# Altium PCB PCB1.PcbDoc (part 2 of 2)
Units mm, origin at the board's own origin, x right, y up, seen from the top; angles counter-clockwise.
Board outline 100.2 x 69.85 mm, 2 copper layers (Top Layer, Bottom Layer); 190 components, 160 nets, 546 pads, 233 vias.
Unrouted connection lines stored in the file: 15.
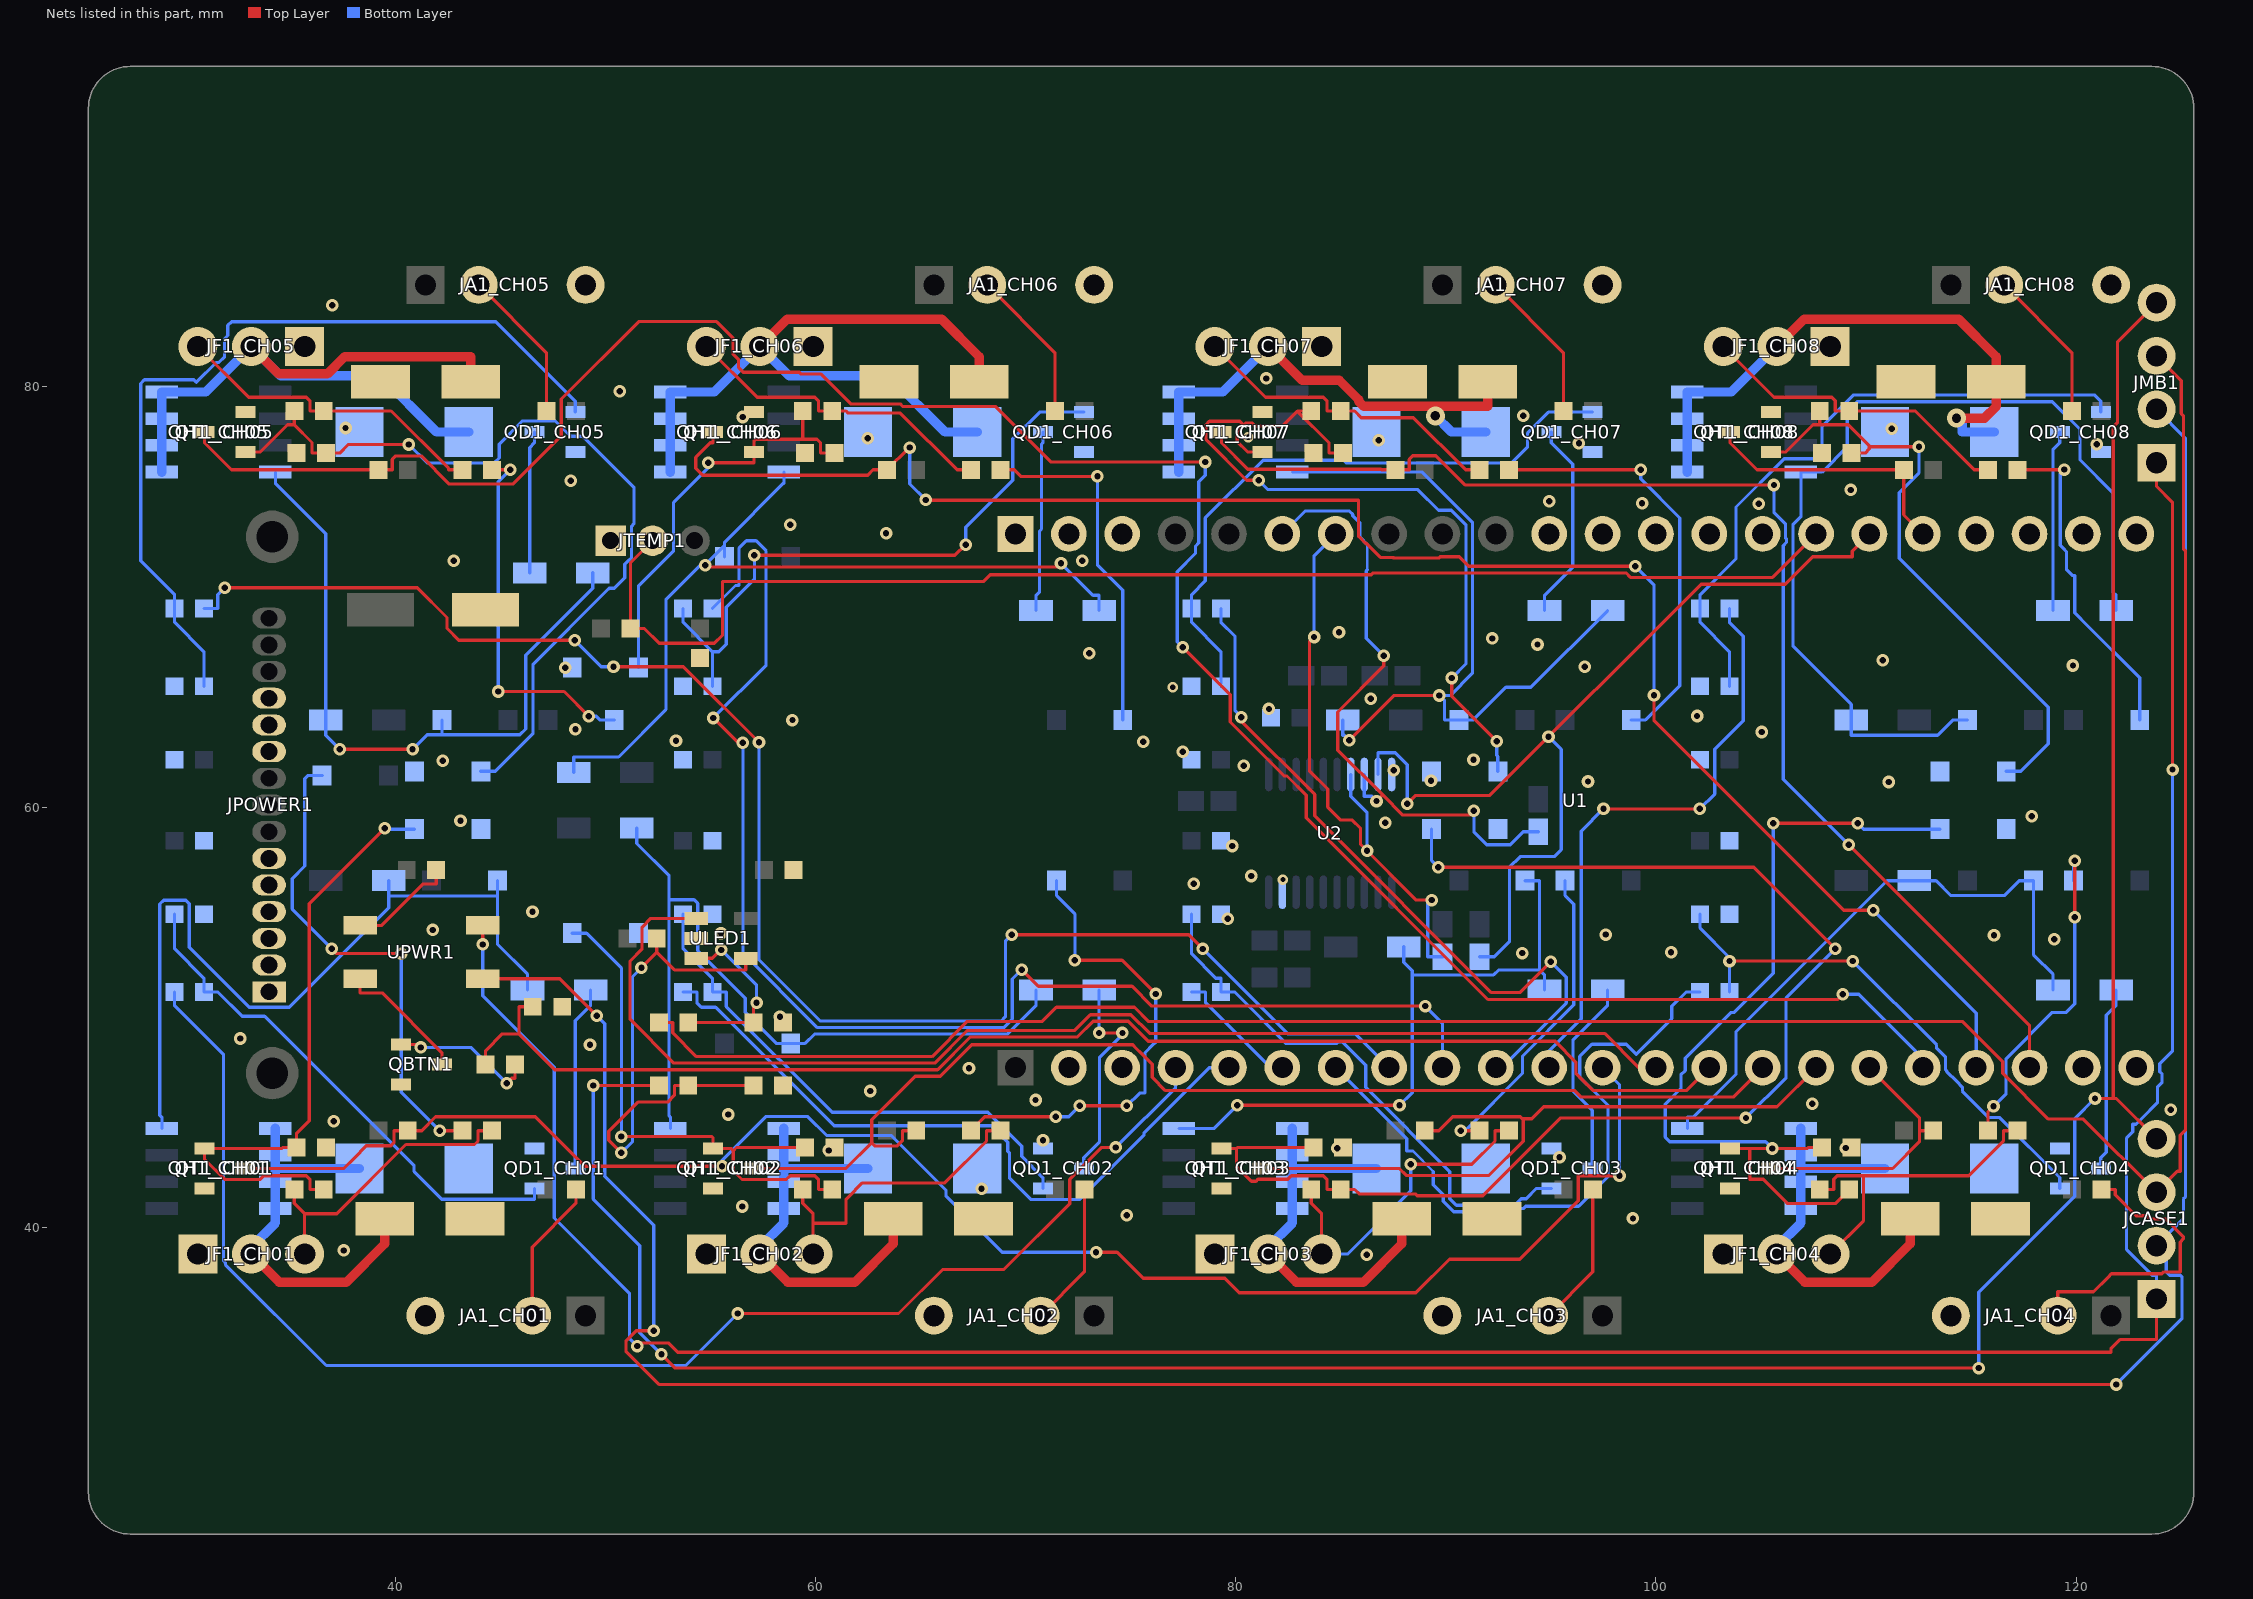
[diagram p2: the nets of this part, all layers, seen from the top]

## Via types
v1: diameter 0.6, hole 0.3, Top Layer to Bottom Layer, 228 vias
v2: diameter 0.5, hole 0.25, Top Layer to Bottom Layer, 3 vias
v3: diameter 0.9, hole 0.45, Top Layer to Bottom Layer, 2 vias

## Nets (pads, with @x,y where several pads share a name; then routed paths per layer and width w, separated by ;. In a path a pad name is that pad's centre, name@x,y a point inside that pad or via, vN(x,y) a via of type N, cw(c..) or ccw(c..) an arc to the next point about the centre after c; other vN are vias at no path point) (continued)
ARGB_DATA_CH06: SJ1_CH06.1 U1.J3_7 U2.7 | length 28.5
  Top Layer w0.155: v1(83.731,68.093) 83.51,67.872 83.51,61.733 84.382,60.861 84.382,59.999 84.998,59.383 85.549,59.383 85.941,58.992 85.941,58.231 88.598,55.574 v1(89.325,55.574)
  Bottom Layer w0.155: v1(83.731,68.093) 83.731,71.97 U1.J3_7@84.761,73 ; U2.7@85.475,61.55 85.475,60.516 86.254,59.737 v1(86.254,57.918) ; v1(89.325,55.574) 89.141,55.39 89.141,52.875 SJ1_CH06.1@89.85,52.875
ARGB_DATA_CH07: SJ1_CH07.1 U1.J3_6 U2.8 | length 31.2
  Top Layer w0.155: v1(86.701,60.287) 86.99,60.576 ; v1(87.052,67.198) 87.052,66.716 84.861,64.525 84.861,62.705 86.99,60.576 ; v1(91.337,59.822) 91.135,59.62 87.946,59.62 86.99,60.576
  Bottom Layer w0.116: 86.27,71.292 86.27,72.487
  Bottom Layer w0.155: U1.J3_6@82.221,73 83.313,74.092 85.408,74.092 85.572,73.928 85.572,73.869 85.883,73.559 85.923,73.519 85.923,73.091 85.923,72.835 86.27,72.487 ; U2.8@86.125,61.55 86.125,60.516 86.472,60.516 v1(86.701,60.287) ; 86.27,71.292 86.218,71.24 86.218,68.031 v1(87.052,67.198) ; v1(91.337,59.822) 91.337,58.825 91.953,58.209 93.075,58.209 93.691,58.825 SJ1_CH07.1@94.4,58.825
ARGB_DATA_CH08: SJ1_CH08.1 U1.J3_17 U2.9 | length 45.7
  Top Layer w0.155: v1(88.167,60.154) 88.569,60.556 92.097,60.556 102.151,70.61 106.159,70.61 107.466,71.917 109.339,71.917 109.339,72.178 U1.J3_17@110.161,73
  Bottom Layer w0.155: U2.9@86.775,61.55 86.775,62.584 87.601,62.584 88.167,62.018 v1(88.167,60.154) ; SJ1_CH08.1@91.6,52.875 92.309,52.875 93.028,53.594 93.028,56.21 93.028,56.43 93.028,56.915 93.028,57.134 93.539,57.645 95.164,57.645 95.495,57.976 95.495,62.745 v1(94.89,63.349)
DB_CH01: QD1_CH01.1 RBE1_CH01.1 RPWM1_CH01.2 | length 24.8
  Bottom Layer w0.155: RBE1_CH01.1@29.5,54.9 29.5,53.259 30.9,51.859 RPWM1_CH01.2@30.9,51.2 31.559,51.2 32.714,50.046 33.782,50.046 40.897,42.931 40.897,42.654 42.215,41.336 46.625,41.336 QD1_CH01.1@46.625,41.85
DB_CH02: QD1_CH02.1 RBE1_CH02.1 RPWM1_CH02.2 | length 24.9
  Bottom Layer w0.155: RBE1_CH02.1@53.7,54.9 53.7,53.259 55.1,51.859 RPWM1_CH02.2@55.1,51.2 55.759,51.2 55.759,50.507 60.791,45.475 68.197,45.475 69.813,43.859 69.813,43.376 70.825,42.364 QD1_CH02.1@70.825,41.85
DB_CH03: QD1_CH03.1 RBE1_CH03.1 RPWM1_CH03.2 | length 26.1
  Bottom Layer w0.155: RBE1_CH03.1@77.9,54.9 77.9,53.016 79.057,51.859 79.3,51.859 RPWM1_CH03.2@79.3,51.2 79.959,51.2 82.412,48.747 84.35,48.747 84.79,48.747 84.858,48.815 85.093,48.815 86.187,47.722 86.187,46.662 90.193,42.655 90.193,41.366 90.505,41.054 93.276,41.054 93.584,41.362 93.827,41.362 94.316,41.85 QD1_CH03.1@95.025,41.85
DB_CH04: QD1_CH04.1 RBE1_CH04.1 RPWM1_CH04.2 | length 25.4
  Top Layer w0.155: v1(103.5,52.671) v1(109.369,52.671)
  Bottom Layer w0.155: RBE1_CH04.1@102.1,54.9 102.1,54.241 103.5,52.841 RPWM1_CH04.2@103.5,51.2 ; v1(109.369,52.671) 113.357,48.683 113.357,48.528 113.629,48.256 113.784,48.101 113.784,47.5 113.848,47.435 113.848,47.41 114.314,46.944 114.585,46.672 114.585,46.484 115.847,45.223 116.373,45.223 119.225,42.371 QD1_CH04.1@119.225,41.85
DB_CH05: QD1_CH05.1 RBE1_CH05.1 RPWM1_CH05.2 | length 40.5
  Bottom Layer w0.155: RBE1_CH05.1@30.9,65.75 30.9,67.391 29.5,68.791 29.5,70.109 27.889,71.72 27.889,80.159 28.065,80.335 30.418,80.335 30.54,80.213 31.485,81.158 31.612,81.158 31.88,81.425 31.88,82.287 32.035,82.442 32.035,82.923 32.214,83.101 44.788,83.101 48.575,79.314 QD1_CH05.1@48.575,78.8
DB_CH06: QD1_CH06.1 RBE1_CH06.1 RPWM1_CH06.2 | length 30
  Top Layer w0.155: v1(57.096,71.981) 66.64,71.981 v1(67.151,72.492)
  Bottom Layer w0.155: RPWM1_CH06.2@53.7,69.45 53.7,68.791 55.1,67.391 ; RBE1_CH06.1@55.1,65.75 55.1,67.391 ; v1(57.096,71.981) 57.096,70.844 55.992,69.739 55.989,69.739 55.758,69.508 55.758,67.755 55.393,67.391 55.1,67.391 ; v1(67.151,72.492) 67.151,73.312 69.393,75.554 69.393,77.526 70.667,78.8 QD1_CH06.1@72.775,78.8
DB_CH07: QD1_CH07.1 RBE1_CH07.1 RPWM1_CH07.2 | length 29.9
  Bottom Layer w0.155: RBE1_CH07.1@79.3,65.75 79.3,67.391 77.9,68.791 77.9,70.109 78.556,70.765 78.556,73.761 81.303,76.509 85.131,76.509 85.262,76.378 93.131,76.378 93.891,77.139 93.891,77.808 94.884,78.8 QD1_CH07.1@96.975,78.8
DB_CH08: QD1_CH08.1 RBE1_CH08.1 RPWM1_CH08.2 | length 30.8
  Bottom Layer w0.155: RBE1_CH08.1@103.5,65.75 103.5,67.391 102.1,68.791 102.1,70.109 103.811,71.82 103.811,74.28 106.104,76.573 107.664,76.573 107.909,76.818 107.909,78.128 109.389,79.607 120.882,79.607 121.175,79.314 QD1_CH08.1@121.175,78.8
DC_CH01: QD1_CH01.3 RG1_CH01.2 | length 8.8
  Bottom Layer w0.155: QD1_CH01.3@48.575,42.8 48.575,49.841 49.3,50.566 RG1_CH01.2@49.3,51.3
DC_CH02: QD1_CH02.3 RG1_CH02.2 | length 10.4
  Top Layer w0.155: v1(73.5,49.252) v1(74.61,49.252)
  Bottom Layer w0.155: QD1_CH02.3@72.775,42.8 72.775,43.314 73.517,44.056 73.517,48.073 74.61,49.166 v1(74.61,49.252) ; v1(73.5,49.252) RG1_CH02.2@73.5,51.3
DC_CH03: QD1_CH03.3 RG1_CH03.2 | length 9.6
  Bottom Layer w0.155: QD1_CH03.3@96.975,42.8 96.975,45.562 96.06,46.477 96.06,48.925 97.7,50.566 RG1_CH03.2@97.7,51.3
DC_CH04: QD1_CH04.3 RG1_CH04.2 | length 8.8
  Bottom Layer w0.155: QD1_CH04.3@121.175,42.8 121.175,43.314 121.433,43.572 121.433,50.099 121.9,50.566 RG1_CH04.2@121.9,51.3
DC_CH05: QD1_CH05.3 RG1_CH05.2 | length 6.8
  Bottom Layer w0.155: RG1_CH05.2@46.4,71.15 46.4,77.111 46.625,77.336 QD1_CH05.3@46.625,77.85
DC_CH06: QD1_CH06.3 RG1_CH06.2 | length 8.6
  Bottom Layer w0.155: RG1_CH06.2@70.5,69.35 70.5,70.084 70.668,70.252 70.668,72.919 70.668,73.138 70.759,73.229 70.759,77.27 70.825,77.336 QD1_CH06.3@70.825,77.85
DC_CH07: QD1_CH07.3 RG1_CH07.2 | length 9.5
  Bottom Layer w0.155: RG1_CH07.2@94.7,69.35 94.7,70.084 96.036,71.42 96.036,76.325 95.025,77.336 QD1_CH07.3@95.025,77.85
DC_CH08: QD1_CH08.3 RG1_CH08.2 | length 8.6
  Bottom Layer w0.155: RG1_CH08.2@118.9,69.35 118.9,70.084 118.897,70.088 118.897,77.007 119.225,77.336 QD1_CH08.3@119.225,77.85
FAN_VOUT_CH01: COUT1_CH01.1 DF1_CH01.1 JF1_CH01.2 QH1_CH01.5 QH1_CH01.6 QH1_CH01.7 QH1_CH01.8 | length 19.3
  Top Layer w0.45: JF1_CH01.2@33.15,38.73 34.49,37.39 37.676,37.39 39.505,39.218 COUT1_CH01.1@39.505,40.4
  Bottom Layer w0.45: JF1_CH01.2@33.15,38.73 33.15,39.063 34.3,40.213 34.3,42.8 ; QH1_CH01.5@34.3,44.705 34.3,42.8 ; DF1_CH01.1@38.3,42.8 34.3,42.8
FAN_VOUT_CH02: COUT1_CH02.1 DF1_CH02.1 JF1_CH02.2 QH1_CH02.5 QH1_CH02.6 QH1_CH02.7 QH1_CH02.8 | length 19.3
  Top Layer w0.45: JF1_CH02.2@57.35,38.73 58.69,37.39 61.876,37.39 63.705,39.218 COUT1_CH02.1@63.705,40.4
  Bottom Layer w0.45: JF1_CH02.2@57.35,38.73 57.35,39.063 58.5,40.213 58.5,42.8 ; QH1_CH02.5@58.5,44.705 58.5,42.8 ; DF1_CH02.1@62.5,42.8 58.5,42.8
FAN_VOUT_CH03: COUT1_CH03.1 DF1_CH03.1 JF1_CH03.2 QH1_CH03.5 QH1_CH03.6 QH1_CH03.7 QH1_CH03.8 | length 19.3
  Top Layer w0.45: JF1_CH03.2@81.55,38.73 82.89,37.39 86.076,37.39 87.905,39.218 COUT1_CH03.1@87.905,40.4
  Bottom Layer w0.45: JF1_CH03.2@81.55,38.73 81.55,39.063 82.7,40.213 82.7,42.8 ; QH1_CH03.5@82.7,44.705 82.7,42.8 ; DF1_CH03.1@86.7,42.8 82.7,42.8
FAN_VOUT_CH04: COUT1_CH04.1 DF1_CH04.1 JF1_CH04.2 QH1_CH04.5 QH1_CH04.6 QH1_CH04.7 QH1_CH04.8 | length 19.3
  Top Layer w0.45: JF1_CH04.2@105.75,38.73 107.09,37.39 110.276,37.39 112.105,39.218 COUT1_CH04.1@112.105,40.4
  Bottom Layer w0.45: JF1_CH04.2@105.75,38.73 105.75,39.063 106.9,40.213 106.9,42.8 ; QH1_CH04.5@106.9,44.705 106.9,42.8 ; DF1_CH04.1@110.9,42.8 106.9,42.8
FAN_VOUT_CH05: COUT1_CH05.1 DF1_CH05.1 JF1_CH05.2 QH1_CH05.5 QH1_CH05.6 QH1_CH05.7 QH1_CH05.8 | length 33.5
  Top Layer w0.45: JF1_CH05.2@33.15,81.92 34.457,80.613 36.773,80.613 37.591,81.432 43.595,81.432 COUT1_CH05.1@43.595,80.25
  Bottom Layer w0.45: QH1_CH05.5@28.9,75.945 QH1_CH05.8@28.9,79.755 30.057,79.755 30.058,79.754 30.983,79.754 JF1_CH05.2@33.15,81.92 34.545,80.525 39.293,80.525 41.968,77.85 DF1_CH05.1@43.5,77.85
FAN_VOUT_CH06: COUT1_CH06.1 DF1_CH06.1 JF1_CH06.2 QH1_CH06.5 QH1_CH06.6 QH1_CH06.7 QH1_CH06.8 | length 33.9
  Top Layer w0.45: JF1_CH06.2@57.35,81.92 58.657,83.227 66,83.227 67.795,81.432 COUT1_CH06.1@67.795,80.25
  Bottom Layer w0.45: QH1_CH06.5@53.1,75.945 QH1_CH06.8@53.1,79.755 55.185,79.755 JF1_CH06.2@57.35,81.92 58.745,80.525 63.493,80.525 66.168,77.85 DF1_CH06.1@67.7,77.85
FAN_VOUT_CH07: COUT1_CH07.1 DF1_CH07.1 JF1_CH07.2 QH1_CH07.5 QH1_CH07.6 QH1_CH07.7 QH1_CH07.8 | length 25
  Top Layer w0.45: JF1_CH07.2@81.55,81.92 83.158,80.312 84.928,80.312 85.857,79.382 85.857,79.304 86.093,79.068 v3@89.501,79.068 ; v3(89.501,78.621) v3@89.501,79.068 ; COUT1_CH07.1@91.995,80.25 91.995,79.068 v3@89.501,79.068
  Bottom Layer w0.45: QH1_CH07.5@77.3,75.945 QH1_CH07.8@77.3,79.755 79.385,79.755 JF1_CH07.2@81.55,81.92 ; v3(89.501,78.621) 90.272,77.85 DF1_CH07.1@91.9,77.85
FAN_VOUT_CH08: COUT1_CH08.1 DF1_CH08.1 JF1_CH08.2 QH1_CH08.5 QH1_CH08.6 QH1_CH08.7 QH1_CH08.8 | length 27.5
  Top Layer w0.45: JF1_CH08.2@105.75,81.92 107.057,83.227 114.4,83.227 116.195,81.432 116.195,79.068 115.638,78.511 v3(114.305,78.511)
  Bottom Layer w0.45: QH1_CH08.5@101.5,75.945 QH1_CH08.8@101.5,79.755 103.585,79.755 JF1_CH08.2@105.75,81.92 ; v3(114.305,78.511) 114.568,78.248 114.568,77.85 DF1_CH08.1@116.1,77.85
GATE_CH01: DZ1_CH01.2 QH1_CH01.4 RG1_CH01.1 RGS1_CH01.2 | length 39.2
  Bottom Layer w0.155: QH1_CH01.4@28.9,44.705 28.9,45.239 28.799,45.34 28.799,55.386 28.984,55.571 30.032,55.571 30.2,55.403 30.2,53.326 33.054,50.473 34.959,50.473 39.7,55.214 39.7,55.766 ; RGS1_CH01.2@39.7,56.5 39.7,55.766 ; DZ1_CH01.2@44.875,56.5 44.875,55.766 ; RG1_CH01.1@46.3,51.3 46.3,52.034 44.875,53.459 44.875,55.766 ; 39.7,55.766 44.875,55.766
GATE_CH02: DZ1_CH02.2 QH1_CH02.4 RG1_CH02.1 RGS1_CH02.2 | length 38.5
  Bottom Layer w0.155: RGS1_CH02.2@51.5,59 51.5,58.266 53.033,56.733 53.033,55.591 ; QH1_CH02.4@53.1,44.705 53.1,45.239 53.033,45.306 53.033,55.591 ; RG1_CH02.1@70.5,51.3 70.5,50.566 69.131,49.196 59.956,49.196 59.509,48.75 58.141,48.75 56.665,50.226 56.665,50.908 54.4,53.173 54.4,55.413 54.223,55.591 53.033,55.591
GATE_CH03: DZ1_CH03.2 QH1_CH03.4 RG1_CH03.1 RGS1_CH03.2 | length 31.1
  Top Layer w0.155: v1(80.079,45.806) v1(87.798,45.806)
  Bottom Layer w0.155: QH1_CH03.4@77.3,44.705 78.978,44.705 v1(80.079,45.806) ; v1(87.798,45.806) 88.399,46.406 88.399,52.01 ; RGS1_CH03.2@88,53.35 88,52.616 88.399,52.217 88.399,52.01 ; DZ1_CH03.2@93.775,56.5 94.459,56.5 94.459,52.246 ; RG1_CH03.1@94.7,51.3 94.7,52.034 94.671,52.034 94.459,52.246 ; 88.399,52.01 92.274,52.01 92.511,52.246 94.459,52.246
GATE_CH04: DZ1_CH04.2 QH1_CH04.4 RG1_CH04.1 RGS1_CH04.2 | length 29
  Bottom Layer w0.155: QH1_CH04.4@101.5,44.705 101.5,45.239 101.767,45.239 103.811,47.283 103.811,49.314 110.997,56.5 113.334,56.5 114.043,55.791 116.582,55.791 117.291,56.5 DZ1_CH04.2@117.975,56.5 117.975,52.959 118.9,52.034 RG1_CH04.1@118.9,51.3
GATE_CH05: DZ1_CH05.2 QH1_CH05.4 RG1_CH05.1 RGS1_CH05.2 | length 33.2
  Top Layer w0.155: v1(37.367,62.749) v1(40.828,62.749)
  Bottom Layer w0.155: QH1_CH05.4@34.3,75.945 34.3,75.411 36.7,73.011 36.7,63.416 v1(37.367,62.749) ; v1(40.828,62.749) 41.52,63.441 42.225,63.441 ; DZ1_CH05.2@42.225,64.15 42.225,63.441 ; RG1_CH05.1@49.4,71.15 49.4,70.416 46.21,67.226 46.21,63.716 45.935,63.441 42.225,63.441
GATE_CH06: DZ1_CH06.2 QH1_CH06.4 RG1_CH06.1 RGS1_CH06.2 | length 40.6
  Top Layer w0.155: v1(54.759,71.504) 54.837,71.425 71.505,71.425 v1(71.686,71.606)
  Bottom Layer w0.155: RGS1_CH06.2@48.5,61.65 48.5,62.384 50.632,62.384 52.887,64.639 52.887,69.871 54.52,71.504 v1(54.759,71.504) 54.759,71.534 55.675,72.451 ; DZ1_CH06.2@55.675,71.9 55.675,72.451 ; QH1_CH06.4@58.5,75.945 58.5,75.411 58.477,75.411 55.675,72.609 55.675,72.451 ; v1(71.686,71.606) 73.207,70.084 73.5,70.084 RG1_CH06.1@73.5,69.35
GATE_CH07: DZ1_CH07.2 QH1_CH07.4 RG1_CH07.1 RGS1_CH07.2 | length 36.2
  Top Layer w0.155: v1(85.398,63.184) 87.523,65.309 v1(89.688,65.309)
  Bottom Layer w0.155: QH1_CH07.4@82.7,75.945 88.886,75.945 91.268,73.563 91.268,66.366 90.21,65.309 v1(89.688,65.309) 89.941,65.056 89.941,64.15 91.309,64.15 92.861,65.701 94.051,65.701 RG1_CH07.1@97.7,69.35 ; RGS1_CH07.2@85.1,64.15 85.1,63.416 85.167,63.416 v1(85.398,63.184)
GATE_CH08: DZ1_CH08.2 QH1_CH08.4 RG1_CH08.1 RGS1_CH08.2 | length 45.2
  Bottom Layer w0.155: DZ1_CH08.2@114.825,64.15 114.141,64.15 113.407,63.416 109.3,63.416 109.3,64.884 106.525,67.659 106.525,73.429 106.522,73.432 106.9,73.81 106.9,73.928 QH1_CH08.4@106.9,75.945 107.909,75.945 109.105,77.141 109.105,78.814 109.587,79.296 118.87,79.296 120.182,77.983 120.182,76.532 121.748,74.966 121.748,70.236 121.9,70.084 RG1_CH08.1@121.9,69.35
GND: C1.2 C12B.2 CIN1_CH01.2 CIN1_CH02.2 CIN1_CH03.2 CIN1_CH04.2 CIN1_CH05.2 CIN1_CH06.2 CIN1_CH07.2 CIN1_CH08.2 CLED1.2 COUT1_CH01.2 COUT1_CH02.2 COUT1_CH03.2 COUT1_CH04.2 COUT1_CH05.2 COUT1_CH06.2 COUT1_CH07.2 COUT1_CH08.2 CTEMP1.2 DF1_CH01.2 DF1_CH02.2 DF1_CH03.2 DF1_CH04.2 DF1_CH05.2 DF1_CH06.2 DF1_CH07.2 DF1_CH08.2 DTNEG1_CH01.2 DTNEG1_CH02.2 DTNEG1_CH03.2 DTNEG1_CH04.2 DTNEG1_CH05.2 DTNEG1_CH06.2 DTNEG1_CH07.2 DTNEG1_CH08.2 JA1_CH01.4 JA1_CH02.4 JA1_CH03.4 JA1_CH04.4 JA1_CH05.4 JA1_CH06.4 JA1_CH07.4 JA1_CH08.4 JF1_CH01.1 JF1_CH02.1 JF1_CH03.1 JF1_CH04.1 JF1_CH05.1 JF1_CH06.1 JF1_CH07.1 JF1_CH08.1 JPOWER1.4 JPOWER1.5 JPOWER1.6 JPOWER1.10 JPOWER1.11 JPOWER1.12 JTEMP1.1 QBTN1.2 QD1_CH01.2 QD1_CH02.2 QD1_CH03.2 QD1_CH04.2 QD1_CH05.2 QD1_CH06.2 QD1_CH07.2 QD1_CH08.2 QT1_CH01.2 QT1_CH02.2 QT1_CH03.2 QT1_CH04.2 QT1_CH05.2 QT1_CH06.2 QT1_CH07.2 QT1_CH08.2 RBE1_CH01.2 RBE1_CH02.2 RBE1_CH03.2 RBE1_CH04.2 RBE1_CH05.2 RBE1_CH06.2 RBE1_CH07.2 RBE1_CH08.2 RLED2.2 RLED4.2 RPWR3.2 RTPD1_CH01.2 RTPD1_CH02.2 RTPD1_CH03.2 RTPD1_CH04.2 RTPD1_CH05.2 RTPD1_CH06.2 RTPD1_CH07.2 RTPD1_CH08.2 U1.J1_22 U1.J3_1 U1.J3_21 U1.J3_22 U2.10 U2.19 ULED1.2
  other v1: 86.232,38.694 37.556,38.9 98.906,40.424 74.819,40.569 56.517,40.99 67.906,41.84 95.413,43.338 60.637,43.659 84.838,43.76 109.038,43.773 70.833,44.141 37.077,45.054 55.85,45.368 124.502,45.59 107.446,45.878 70.476,46.06 62.61,46.49 67.31,47.577 49.273,48.69 32.621,48.987 58.315,50.028 93.635,53.052 100.722,53.086 118.956,53.704 116.088,53.897 97.609,53.932 55.504,53.99 41.787,54.153 79.626,54.689 46.535,55.019 78.005,56.352 80.74,56.72 79.84,58.149 87.121,59.254 43.11,59.346 117.894,59.56 111.075,61.195 96.768,61.217 89.296,61.256 87.52,61.75 80.385,61.971 42.271,62.198 91.318,62.246 77.475,62.641 75.605,63.114 53.363,63.154 105.034,63.571 48.578,63.703 58.905,64.142 101.959,64.337 81.582,64.671 86.428,65.153 48.09,66.637 96.618,66.672 119.846,66.739 110.791,66.984 73.033,67.327 94.363,67.735 92.207,68.026 84.919,68.325 42.79,71.725 72.702,71.717 63.362,73.035 58.796,73.443 104.895,74.436 99.342,74.463 94.929,74.551 109.272,75.093 48.352,75.534 120.974,77.264 96.337,77.316 86.811,77.453 62.486,77.552 111.22,78.001 37.639,78.044 56.547,78.567 93.692,78.627 50.681,79.787 81.456,80.4 37.009,83.876
  other v2: 82.25,56.55 77,65.7 80.6,77.6
NetJA1_CH01_2: JA1_CH01.2 R1_CH01.2 | length 6.9
  Top Layer w0.155: JA1_CH01.2@46.52,35.8 46.52,39.061 48.6,41.141 R1_CH01.2@48.6,41.8
NetJA1_CH02_2: JA1_CH02.2 R1_CH02.2 | length 6.9
  Top Layer w0.155: JA1_CH02.2@70.72,35.8 72.8,37.88 R1_CH02.2@72.8,41.8
NetJA1_CH03_2: JA1_CH03.2 R1_CH03.2 | length 6.9
  Top Layer w0.155: JA1_CH03.2@94.92,35.8 97,37.88 R1_CH03.2@97,41.8
NetJA1_CH04_2: JA1_CH04.2 R1_CH04.2 | length 14.1
  Top Layer w0.155: JA1_CH04.2@119.12,35.8 119.12,36.933 120.825,36.933 121.526,37.634 121.68,37.787 123.864,37.787 124.084,37.787 124.175,37.878 124.958,37.878 124.958,39.3 125.107,39.45 125.107,39.551 124.258,40.4 123.493,40.4 123.338,40.555 122.847,40.555 121.859,41.544 121.859,41.8 R1_CH04.2@121.2,41.8
NetJA1_CH05_2: JA1_CH05.2 R1_CH05.2 | length 7.3
  Top Layer w0.155: JA1_CH05.2@43.98,84.85 47.2,81.63 R1_CH05.2@47.2,78.85
NetJA1_CH06_2: JA1_CH06.2 R1_CH06.2 | length 7.3
  Top Layer w0.155: JA1_CH06.2@68.18,84.85 71.4,81.63 R1_CH06.2@71.4,78.85
NetJA1_CH07_2: JA1_CH07.2 R1_CH07.2 | length 7.3
  Top Layer w0.155: JA1_CH07.2@92.38,84.85 95.6,81.63 R1_CH07.2@95.6,78.85
NetJA1_CH08_2: JA1_CH08.2 R1_CH08.2 | length 7.3
  Top Layer w0.155: JA1_CH08.2@116.58,84.85 119.8,81.63 R1_CH08.2@119.8,78.85
NetJPOWER1_1: JPOWER1.1
NetJPOWER1_2: JPOWER1.2
NetJPOWER1_3: JPOWER1.3
NetU1_J1_1: 
NetU1_J1_2: U1.J1_2
NetU1_J1_3: U1.J1_3
NetU1_J1_4: 
NetU1_J1_5: 
NetU1_J1_6: 
NetU1_J1_7: 
NetU1_J1_8: 
NetU1_J1_9: 
NetU1_J1_10: 
NetU1_J1_11: 
NetU1_J1_12: 
NetU1_J1_13: 
NetU1_J1_14: 
NetU1_J1_15: 
NetU1_J1_16: 
NetU1_J1_17: 
NetU1_J1_18: 
NetU1_J1_19: 
NetU1_J1_20: 
NetU1_J1_21: U1.J1_21
NetU1_J1_22: 
NetU1_J3_1: 
NetU1_J3_2: U1.J3_2
NetU1_J3_3: U1.J3_3
NetU1_J3_4: 
NetU1_J3_5: 
NetU1_J3_6: 
NetU1_J3_7: 
NetU1_J3_8: 
NetU1_J3_9: 
NetU1_J3_10: 
NetU1_J3_11: U1.J3_11
NetU1_J3_12: U1.J3_12
NetU1_J3_13: U1.J3_13
NetU1_J3_14: U1.J3_14
NetU1_J3_15: U1.J3_15
NetU1_J3_16: 
NetU1_J3_17: 
NetU1_J3_18: 
NetU1_J3_19: U1.J3_19
NetU1_J3_20: U1.J3_20
NetU1_J3_21: 
NetU1_J3_22: 
PC_LED_VM: RLED3.2 RLED4.1 RLED5.2 ULED1.4 | length 25.4
  Top Layer w0.155: v1(50.765,43.55) 50.167,44.148 50.167,44.577 51.551,45.962 52.97,45.962 53.291,46.282 53.291,46.75 RLED4.1@57.05,46.75 ; v1(51.719,52.357) 52.451,53.09 ; RLED5.2@52.45,53.75 52.45,53.091 52.451,53.09 ; ULED1.4@56.68,52.8 56.68,52.251 53.29,52.251 52.451,53.09
  Bottom Layer w0.155: v1(50.765,43.55) 51.3,44.085 51.3,51.938 v1(51.719,52.357)
PC_LED_VP: RLED1.2 RLED2.1 ULED1.3 | length 8.7
  Top Layer w0.155: RLED1.2@53.95,49.75 RLED2.1@57.05,49.75 57.05,50.539 v1(57.199,50.687) ; ULED1.3@54.32,52.8 55.095,52.8 55.497,53.202 v1(55.521,53.202)
  Bottom Layer w0.155: v1(55.521,53.202) 57.199,51.524 v1(57.199,50.687)
PC_PLED_A: JCASE1.3 JMB1.3 RLED1.1 | length 118.2
  Top Layer w0.155: RLED1.1@52.55,49.75 53.209,49.75 53.209,49.256 54.337,48.128 65.554,48.128 67.222,49.797 70.796,49.797 71.471,50.472 75.186,50.472 75.868,49.79 114.599,49.79 116.511,47.878 116.511,47.323 118.681,45.153 120.342,45.153 JCASE1.3@123.825,41.67 124.82,42.665 124.958,42.665 124.958,44.38 125.107,44.53 125.198,44.621 125.198,71.975 125.198,72.194 125.107,72.285 125.107,78.625 125.005,78.728 125.005,79.133 125.005,80.29 JMB1.3@123.825,81.47
PC_PLED_K: JCASE1.4 JMB1.4 RLED3.1 | length 137.8
  Top Layer w0.155: v1(49.424,46.75) RLED3.1@52.55,46.75 ; v1(52.672,33.957) 53.328,33.301 v1(115.367,33.301) ; v1(120.895,46.132) 121.765,46.132 ; JCASE1.4@123.825,44.21 121.903,46.132 121.765,46.132 ; JMB1.4@123.825,84.01 121.97,82.155 121.97,78.305 121.765,78.1 121.765,46.132
  Bottom Layer w0.155: v1(49.424,46.75) 49.424,41.344 51.642,39.125 51.642,34.987 v1(52.672,33.957) ; v1(115.367,33.301) 115.367,36.905 119.934,41.473 119.934,45.171 v1(120.895,46.132)
PC_PLED_SENSE: U1.J1_13 ULED1.1 | length 59.1
  Top Layer w0.155: ULED1.1@54.32,54.7 52.162,54.7 51.75,54.287 51.75,53.248 51.178,52.675 51.178,49.897 53.258,47.816 65.683,47.816 67.237,49.371 72.338,49.371 73.088,50.122 75.012,50.122 75.907,49.227 97.556,49.227 99.183,47.6 U1.J1_13@100.001,47.6
PC_PWR_ANODE: RPWR1.2 UPWR1.1 | length 5.1
  Top Layer w0.155: UPWR1.1@38.33,54.37 39.364,54.37 41.335,56.341 41.95,56.341 RPWR1.2@41.95,57
PC_PWR_BASE: QBTN1.1 RPWR2.2 | length 6.9
  Top Layer w0.155: QBTN1.1@40.275,48.7 41.082,48.7 v1(41.219,48.563) ; v1(45.305,46.859) 45.537,47.091 45.7,47.091 RPWR2.2@45.7,47.75
  Bottom Layer w0.155: v1(41.219,48.563) 43.602,48.563 v1(45.305,46.859)
PC_PWR_CATHODE: QBTN1.3 UPWR1.2 | length 6.3
  Top Layer w0.155: UPWR1.2@38.33,51.83 38.33,51.156 39.381,51.156 42.225,48.312 QBTN1.3@42.225,47.75
PC_PWR_PULSE: RPWR2.1 RPWR3.1 U1.J1_14 | length 65
  Top Layer w0.155: RPWR2.1@44.3,47.75 44.3,48.409 45.095,49.205 45.891,49.205 ; RPWR3.1@46.55,50.5 45.891,50.5 45.891,49.205 ; U1.J1_14@102.541,47.6 101.45,46.509 97.01,46.509 96.191,47.327 96.191,47.863 95.204,48.85 75.842,48.85 74.883,49.81 73.218,49.81 72.467,49.059 67.366,49.059 65.812,47.504 47.591,47.504 45.891,49.205
PC_SW_A: JCASE1.1 JMB1.1 UPWR1.4 | length 139.8
  Top Layer w0.155: v1(44.17,53.463) UPWR1.4@44.17,54.37 ; v1(51.516,34.348) 51.659,34.491 53.015,34.491 53.446,34.061 121.654,34.061 121.654,34.216 122.106,34.667 123.825,34.667 JCASE1.1@123.825,36.59 ; JMB1.1@123.825,76.39 123.825,75.256 124.588,74.493 v1(124.588,61.785)
  Bottom Layer w0.155: v1(44.17,53.463) 44.17,51.027 47.571,47.626 47.571,40.445 51.147,36.868 51.147,34.717 v1(51.516,34.348) ; JCASE1.1@123.825,36.59 123.825,37.724 123.612,37.724 122.397,38.939 122.397,44.255 122.692,44.551 122.692,44.901 122.847,44.901 123.134,45.187 123.869,45.922 123.869,46.672 124.091,46.894 124.091,47.298 123.981,47.408 123.981,47.792 124.588,48.399 v1(124.588,61.785)
PC_SW_B: JCASE1.2 JMB1.2 UPWR1.3 | length 145.5
  Top Layer w0.155: UPWR1.3@44.17,51.83 47.834,51.83 v1(49.595,50.068) ; v1(52.309,35.076) 51.469,35.076 50.981,34.588 50.981,34.093 52.553,32.522 v1(121.906,32.522)
  Bottom Layer w0.155: v1(49.595,50.068) 49.972,49.692 49.972,42.435 52.309,40.098 v1(52.309,35.076) ; v1(121.906,32.522) 125.032,35.648 125.032,37.649 124.958,37.723 124.446,37.723 124.29,37.879 124.29,38.665 JCASE1.2@123.825,39.13 125.107,40.412 125.107,41.35 125.198,41.441 125.198,41.661 125.198,77.557 JMB1.2@123.825,78.93
PWM_CH01: RPWM1_CH01.1 U1.J1_4 | length 68.3
  Top Layer w0.155: v1(56.306,35.898) 63.955,35.898 66.05,37.994 68.971,37.994 72.1,41.123 72.1,42.282 73.621,43.803 v1(74.297,43.803)
  Bottom Layer w0.155: RPWM1_CH01.1@29.5,51.2 29.5,50.541 31.832,48.209 31.832,38.63 31.832,38.411 31.923,38.32 31.923,38.226 36.726,33.423 53.832,33.423 v1(56.306,35.898) ; v1(74.297,43.803) 77.141,46.647 U1.J1_4@77.141,47.6
PWM_CH02: RPWM1_CH02.1 U1.J1_5 | length 34
  Bottom Layer w0.155: RPWM1_CH02.1@53.7,51.2 54.359,51.2 54.359,50.692 54.573,50.478 55.027,50.478 55.247,50.478 59.421,46.304 60.888,44.837 68.368,44.837 69.147,44.057 69.147,43.838 69.147,43.619 69.238,43.528 69.238,42.329 70.239,41.328 72.578,41.328 75.633,44.384 75.633,44.488 78.745,47.6 U1.J1_5@79.681,47.6
PWM_CH03: RPWM1_CH03.1 U1.J1_6 | length 6.1
  Bottom Layer w0.155: RPWM1_CH03.1@77.9,51.2 78.559,51.2 78.559,50.708 81.667,47.6 U1.J1_6@82.221,47.6
PWM_CH04: RPWM1_CH04.1 U1.J1_7 | length 31.4
  Bottom Layer w0.116: 88.431,43.633 89.406,42.658
  Bottom Layer w0.155: U1.J1_7@84.761,47.6 88.147,44.214 88.147,43.633 88.431,43.633 ; 89.406,42.658 89.406,42.155 89.406,42.017 89.881,41.541 89.881,41.237 90.375,40.742 93.405,40.742 93.562,40.899 93.707,40.899 93.81,41.003 96.318,41.003 97.72,42.405 97.72,45.806 97.15,46.376 97.15,46.379 96.377,47.151 96.377,48.135 96.954,48.712 98.589,48.712 99.063,48.239 99.206,48.382 100.759,49.935 100.759,50.518 101.441,51.2 RPWM1_CH04.1@102.1,51.2
PWM_CH05: RPWM1_CH05.1 U1.J1_8 | length 78.5
  Top Layer w0.155: v1(31.884,70.434) 41.054,70.434 42.466,69.022 42.466,68.503 43.028,67.94 v1(48.539,67.94) ; v1(50.389,66.683) 53.717,66.683 v1(57.314,63.086) ; v1(69.347,53.927) 77.762,53.927 v1(78.439,53.249)
  Bottom Layer w0.155: RPWM1_CH05.1@30.9,69.45 31.559,69.45 31.559,70.109 v1(31.884,70.434) ; v1(48.539,67.94) 49.796,66.683 v1(50.389,66.683) ; v1(57.314,63.086) 57.314,52.732 60.226,49.82 68.84,49.82 69.042,50.022 69.042,53.622 v1(69.347,53.927) ; v1(78.439,53.249) 82.478,49.211 85.69,49.211 U1.J1_8@87.301,47.6
PWM_CH06: RPWM1_CH06.1 U1.J1_9 | length 66.2
  Top Layer w0.155: v1(55.144,64.241) 56.319,63.066 v1(56.548,63.066) ; v1(69.818,52.265) 70.614,51.469 75.071,51.469 76.01,50.53 v1(89.028,50.53)
  Bottom Layer w0.155: RPWM1_CH06.1@55.1,69.45 56.196,70.546 56.358,70.546 56.358,72.309 56.718,72.669 57.173,72.669 57.65,72.192 57.65,66.748 v1(55.144,64.241) ; v1(56.548,63.066) 56.548,53.057 60.097,49.508 68.969,49.508 69.371,49.911 69.371,51.818 v1(69.818,52.265) ; v1(89.028,50.53) 89.841,49.716 U1.J1_9@89.841,47.6
PWM_CH07: RPWM1_CH07.1 U1.J1_10 | length 33.9
  Top Layer w0.155: v1(80.271,64.277) 80.271,64.09 83.759,60.602 83.759,59.586 92.172,51.173 93.53,51.173 v1(94.994,52.637)
  Bottom Layer w0.155: RPWM1_CH07.1@79.3,69.45 79.3,68.791 79.971,68.119 79.971,64.577 v1(80.271,64.277) ; U1.J1_10@92.381,47.6 92.66,47.6 95.734,50.674 95.734,51.897 v1(94.994,52.637)
PWM_CH08: RPWM1_CH08.1 U1.J1_11 | length 28.6
  Top Layer w0.155: v1(97.503,59.914) v1(102.092,59.914)
  Bottom Layer w0.155: U1.J1_11@94.921,47.6 94.921,48.397 96.443,49.919 96.443,58.854 v1(97.503,59.914) ; v1(102.092,59.914) 102.8,60.621 102.8,62.753 104.161,64.113 104.161,68.13 103.5,68.791 RPWM1_CH08.1@103.5,69.45
TACH_CH01: QT1_CH01.3 RTCO1_CH01.2 U1.J1_12 | length 81
  Top Layer w0.155: QT1_CH01.3@32.875,42.8 37.553,42.8 38.05,43.298 38.629,43.876 39.787,43.876 39.941,44.03 39.941,44.6 41.259,44.6 41.918,45.259 46.676,45.259 49.025,42.91 v1(55.557,42.91) ; v1(73.356,38.809) 74.355,38.809 75.592,37.572 79.484,37.572 79.969,37.087 80.167,36.889 88.581,36.889 90.176,38.484 93.524,38.484 96.3,41.261 96.3,42.458 v1(98.268,42.458)
  Bottom Layer w0.155: v1(55.557,42.91) 55.557,43.196 57.632,45.271 59.63,45.271 60.53,44.37 63.618,44.37 66.212,41.776 66.212,41.494 68.897,38.809 v1(73.356,38.809) ; U1.J1_12@97.461,47.6 98.268,46.794 v1(98.268,42.458)
TACH_CH02: QT1_CH02.3 RTCO1_CH02.2 U1.J1_15 | length 55.8
  Top Layer w0.155: QT1_CH02.3@57.075,42.8 61.448,42.8 62.676,44.028 ; RTCO1_CH02.2@64.8,44.6 64.141,44.6 64.141,44.125 63.891,43.876 62.828,43.876 62.676,44.028 ; U1.J1_15@105.081,47.6 103.678,46.197 96.445,46.197 96.133,46.509 76.656,46.509 76.027,47.138 76.027,47.759 75.529,48.257 75.256,48.529 75.101,48.684 67.432,48.684 65.941,47.193 64.749,47.193 62.676,45.12 62.676,44.028
TACH_CH03: QT1_CH03.3 RTCO1_CH03.2 U1.J1_16 | length 34.2
  Top Layer w0.155: QT1_CH03.3@81.275,42.8 87.781,42.8 88.111,42.47 92.055,42.47 93.681,44.096 93.681,45.162 ; RTCO1_CH03.2@89,44.6 89.659,44.6 90.326,45.267 93.543,45.267 93.647,45.162 93.681,45.162 ; U1.J1_16@107.621,47.6 105.762,45.741 94.668,45.741 94.089,45.162 93.681,45.162
TACH_CH04: QT1_CH04.3 RTCO1_CH04.2 U1.J1_17 | length 12.8
  Top Layer w0.155: QT1_CH04.3@105.475,42.8 111.264,42.8 112.541,44.077 112.541,44.6 ; U1.J1_17@110.161,47.6 112.541,45.22 112.541,44.6 ; RTCO1_CH04.2@113.2,44.6 112.541,44.6
TACH_CH05: QT1_CH05.3 RTCO1_CH05.2 U1.J1_18 | length 112.3
  Top Layer w0.155: QT1_CH05.3@30.925,77.85 30.925,77.336 32.211,76.05 39.859,76.05 39.859,76.544 40.026,76.711 41.235,76.711 42.573,75.373 45.604,75.373 47.9,77.669 47.9,79.422 51.586,83.107 55.295,83.107 56.08,82.323 56.08,81.553 56.342,81.291 56.342,80.917 56.562,80.698 59.006,80.698 59.226,80.698 59.317,80.607 60.268,80.607 61.686,79.189 63.821,79.189 64.041,79.189 64.167,79.062 68.588,79.062 71.228,76.422 v1(78.556,76.422) ; v1(77.483,67.61) 79.737,65.356 79.737,64.049 82.308,61.478 82.442,61.478 83.356,60.564 83.356,59.494 92.007,50.843 108.65,50.843 v1(108.894,51.087)
  Bottom Layer w0.155: v1(77.483,67.61) 77.219,67.874 77.219,71.202 78.089,72.072 78.089,72.416 78.244,72.572 78.244,75.479 78.556,75.791 v1(78.556,76.422) ; v1(108.894,51.087) 109.651,51.087 112.701,48.037 U1.J1_18@112.701,47.6
TACH_CH06: QT1_CH06.3 RTCO1_CH06.2 U1.J1_19 | length 83.3
  Top Layer w0.155: QT1_CH06.3@55.125,77.85 55.125,77.336 54.996,77.336 54.303,76.642 54.303,76.131 54.64,75.794 62.485,75.794 62.741,76.05 RTCO1_CH06.2@63.4,76.05 64.459,77.109 v1(64.489,77.109) ; v1(65.246,74.619) 65.264,74.601 85.844,74.601 85.844,72.893 85.905,72.832 86.179,72.558 86.212,72.558 86.89,71.88 87.109,71.88 87.493,71.88 87.522,71.852 89.677,71.852 89.742,71.917 90.636,71.917 91.088,71.465 v1(99.01,71.465) ; v1(99.91,65.324) 99.91,64.106 108.93,55.086 v1(110.339,55.086)
  Bottom Layer w0.155: v1(64.489,77.109) 64.489,75.376 v1(65.246,74.619) ; v1(99.01,71.465) 99.91,70.565 v1(99.91,65.324) ; v1(110.339,55.086) 115.241,50.184 U1.J1_19@115.241,47.6
TACH_CH07: QT1_CH07.3 RTCO1_CH07.2 U1.J1_20 | length 61.4
  Top Layer w0.155: QT1_CH07.3@79.325,77.85 79.325,77.336 80.577,76.084 86.907,76.084 86.941,76.05 88.259,76.05 88.259,76.544 88.43,76.715 89.526,76.715 90.911,75.33 v1(105.616,75.33) ; v1(109.172,58.208) 117.781,49.598 U1.J1_20@117.781,47.6
  Bottom Layer w0.155: v1(105.616,75.33) 105.616,74.033 106.164,73.486 106.164,72.821 106.189,72.796 106.214,72.771 106.214,72.601 106.059,72.446 106.059,72.072 106.059,61.321 v1(109.172,58.208)
TACH_CH08: QT1_CH08.3 RTCO1_CH08.2 U1.J3_18 | length 12.7
  Top Layer w0.155: QT1_CH08.3@103.525,77.85 103.525,77.336 104.811,76.05 RTCO1_CH08.2@111.8,76.05 111.8,73.936 111.802,73.934 111.802,73.9 U1.J3_18@112.701,73
TACH_RAW_CH01: JF1_CH01.3 RTIN1_CH01.1 RTPU1_CH01.2 | length 14.1
  Top Layer w0.155: RTIN1_CH01.1@35.2,41.8 35.2,41.141 35.69,40.651 ; JF1_CH01.3@35.69,38.73 35.69,40.651 ; RTPU1_CH01.2@44.6,44.6 43.941,44.6 43.941,44.106 43.776,43.941 40.511,43.941 37.221,40.651 35.69,40.651
TACH_RAW_CH02: JF1_CH02.3 RTIN1_CH02.1 RTPU1_CH02.2 | length 15
  Top Layer w0.155: RTIN1_CH02.1@59.4,41.8 59.4,41.141 59.89,40.651 59.89,40.199 ; JF1_CH02.3@59.89,38.73 59.89,40.199 ; RTPU1_CH02.2@68.8,44.6 68.141,44.6 68.141,44.106 66.149,42.114 62.239,42.114 61.558,41.433 61.458,41.333 61.458,40.199 59.89,40.199
TACH_RAW_CH03: JF1_CH03.3 RTIN1_CH03.1 RTPU1_CH03.2 | length 15.6
  Top Layer w0.155: RTIN1_CH03.1@83.6,41.8 83.6,41.141 84.09,40.651 JF1_CH03.3@84.09,38.73 ; v1(88.332,43.004) 91.239,43.004 92.341,44.106 92.341,44.6 RTPU1_CH03.2@93,44.6
  Bottom Layer w0.155: JF1_CH03.3@84.09,38.73 85.329,38.73 88.332,41.733 v1(88.332,43.004)
TACH_RAW_CH04: JF1_CH04.3 RTIN1_CH04.1 RTPU1_CH04.2 | length 15.5
  Top Layer w0.155: RTIN1_CH04.1@107.8,41.8 108.459,41.8 108.459,42.294 108.624,42.459 109.881,42.459 ; JF1_CH04.3@108.29,38.73 109.881,40.321 109.881,42.459 ; RTPU1_CH04.2@117.2,44.6 116.541,44.6 116.541,44.106 114.894,42.459 109.881,42.459
TACH_RAW_CH05: JF1_CH05.3 RTIN1_CH05.1 RTPU1_CH05.2 | length 15.3
  Top Layer w0.155: JF1_CH05.3@30.61,81.92 33.021,79.509 35.776,79.509 35.941,79.344 35.941,78.85 39.806,78.85 42.541,76.115 42.541,76.05 RTPU1_CH05.2@43.2,76.05
TACH_RAW_CH06: JF1_CH06.3 RTIN1_CH06.1 RTPU1_CH06.2 | length 15.3
  Top Layer w0.155: JF1_CH06.3@54.81,81.92 57.221,79.509 59.976,79.509 60.141,79.344 60.141,78.85 61.459,78.85 61.559,78.75 64.04,78.75 66.741,76.05 RTPU1_CH06.2@67.4,76.05
TACH_RAW_CH07: JF1_CH07.3 RTIN1_CH07.1 RTPU1_CH07.2 | length 15.3
  Top Layer w0.155: JF1_CH07.3@79.01,81.92 81.421,79.509 84.176,79.509 84.341,79.344 84.341,78.85 85.659,78.85 85.978,78.531 88.46,78.531 90.941,76.05 RTPU1_CH07.2@91.6,76.05
TACH_RAW_CH08: JF1_CH08.3 RTIN1_CH08.1 RTPU1_CH08.2 | length 15.3
  Top Layer w0.155: JF1_CH08.3@103.21,81.92 105.621,79.509 108.376,79.509 108.541,79.344 108.541,78.85 112.341,78.85 115.141,76.05 RTPU1_CH08.2@115.8,76.05
TB_CH01: DTNEG1_CH01.1 QT1_CH01.1 RTIN1_CH01.2 RTPD1_CH01.1 | length 30
  Top Layer w0.155: RTIN1_CH01.2@36.6,41.8 35.941,41.8 35.941,42.294 35.776,42.459 33.755,42.459 33.575,42.28 31.881,42.28 30.925,43.236 QT1_CH01.1@30.925,43.75 34.591,43.75 34.641,43.8 RTPD1_CH01.1@35.3,43.8 35.3,44.459 35.913,45.072 35.913,55.401 v1(39.503,58.991)
  Bottom Layer w0.155: v1(39.503,58.991) 39.543,58.95 DTNEG1_CH01.1@40.925,58.95
TB_CH02: DTNEG1_CH02.1 QT1_CH02.1 RTIN1_CH02.2 RTPD1_CH02.1 | length 26.9
  Top Layer w0.155: v1(50.765,44.318) 55.071,44.318 55.125,44.264 QT1_CH02.1@55.125,43.75 55.989,43.75 56.091,43.648 ; RTPD1_CH02.1@59.5,43.8 56.243,43.8 56.091,43.648 ; RTIN1_CH02.2@60.8,41.8 60.141,41.8 60.141,42.294 59.976,42.459 58.791,42.459 58.607,42.275 56.504,42.275 56.091,42.688 56.091,43.648
  Bottom Layer w0.155: DTNEG1_CH02.1@48.425,54 49.109,54 50.765,52.344 v1(50.765,44.318)
TB_CH03: DTNEG1_CH03.1 QT1_CH03.1 RTIN1_CH03.2 RTPD1_CH03.1 | length 64.4
  Top Layer w0.155: QT1_CH03.1@79.325,43.75 80.034,43.75 ; RTPD1_CH03.1@83.7,43.8 80.084,43.8 80.034,43.75 ; v1(89.639,57.14) 104.661,57.14 v1(108.539,53.262) ; v1(104.283,45.207) 95.47,45.207 91.76,41.497 88.864,41.497 88.645,41.497 88.554,41.588 85.871,41.588 85.659,41.8 84.341,41.8 84.341,42.294 84.176,42.459 82.652,42.459 82.48,42.287 81.06,42.287 80.971,42.199 80.752,42.199 80.034,42.916 80.034,43.75
  Bottom Layer w0.155: DTNEG1_CH03.1@89.325,58.95 89.325,57.453 v1(89.639,57.14) ; v1(104.283,45.207) 106.196,47.119 106.196,50.92 v1(108.539,53.262)
TB_CH04: DTNEG1_CH04.1 QT1_CH04.1 RTIN1_CH04.2 RTPD1_CH04.1 | length 41.9
  Top Layer w0.155: QT1_CH04.1@103.525,43.75 104.471,43.75 ; v1(105.589,59.226) v1(109.612,59.226) ; RTPD1_CH04.1@107.9,43.8 107.241,43.8 107.191,43.75 104.471,43.75 ; RTIN1_CH04.2@109.2,41.8 108.529,41.129 106.273,41.129 106.104,41.297 105.114,42.287 104.471,42.287 104.471,43.75
  Bottom Layer w0.155: v1(105.539,43.75) 105.219,44.07 100.663,44.07 100.439,44.293 100.439,45.857 101.19,46.608 101.19,47.257 101.394,47.462 101.394,47.765 101.394,48.042 103.582,50.229 103.724,50.229 105.589,52.094 v1(105.589,59.226) ; v1(109.612,59.226) 109.888,58.95 DTNEG1_CH04.1@113.525,58.95
TB_CH05: DTNEG1_CH05.1 QT1_CH05.1 RTIN1_CH05.2 RTPD1_CH05.1 | length 40.7
  Top Layer w0.155: QT1_CH05.1@32.875,76.9 33.584,76.9 34.875,78.191 35.2,78.191 ; RTIN1_CH05.2@35.2,78.85 35.2,78.191 ; v1(40.644,77.256) 37.766,77.256 37.359,76.85 36.041,76.85 36.041,77.35 35.2,78.191
  Bottom Layer w0.155: v1(40.644,77.256) 41.52,76.381 44.718,76.381 44.95,76.613 44.95,77.272 46.051,78.373 47.619,78.373 48.344,77.648 48.934,77.648 51.363,75.218 51.363,73.482 51.25,73.37 51.25,72.815 51.25,71.877 51.1,71.727 50.927,71.555 50.927,71.067 50.927,70.912 50.431,70.416 50.186,70.416 50.031,70.261 46.554,66.784 46.554,63.495 44.759,61.7 DTNEG1_CH05.1@44.075,61.7
TB_CH06: DTNEG1_CH06.1 QT1_CH06.1 RTIN1_CH06.2 RTPD1_CH06.1 | length 20.1
  Top Layer w0.155: v1(54.901,76.386) 57.075,76.386 57.075,77.414 57.17,77.509 59.4,77.509 ; RTIN1_CH06.2@59.4,78.85 59.4,77.509 ; RTPD1_CH06.1@60.9,76.85 60.241,76.85 60.241,77.344 60.076,77.509 59.4,77.509
  Bottom Layer w0.155: DTNEG1_CH06.1@51.575,66.65 51.575,70.518 53.25,72.193 53.25,74.498 54.901,76.149 v1(54.901,76.386)
TB_CH07: DTNEG1_CH07.1 QT1_CH07.1 RTIN1_CH07.2 RTPD1_CH07.1 | length 38.8
  Top Layer w0.155: 80.391,78.167 80.271,78.287 80.194,78.364 78.752,78.364 78.591,78.204 78.591,77.474 80.515,75.55 v1(81.099,75.55) ; QT1_CH07.1@81.275,76.9 80.566,76.9 80.071,77.395 80.071,77.628 80.071,77.848 80.182,77.958 80.507,78.283 80.77,78.283 80.778,78.283 80.929,78.132 82.223,78.132 82.938,78.847 ; RTIN1_CH07.2@83.6,78.85 82.941,78.85 82.938,78.847 ; RTPD1_CH07.1@85.1,76.85 84.441,76.85 84.441,77.344 82.938,78.847 ; v1(90.288,66.142) 90.288,65.27 v1(92.426,63.131)
  Bottom Layer w0.155: v1(81.099,75.55) 81.538,75.112 88.666,75.112 89.654,74.124 90.047,74.124 90.266,74.124 90.956,73.434 90.956,66.81 v1(90.288,66.142) ; v1(92.426,63.131) 92.426,62.458 92.475,62.409 DTNEG1_CH07.1@92.475,61.7
TB_CH08: DTNEG1_CH08.1 QT1_CH08.1 RTIN1_CH08.2 RTPD1_CH08.1 | length 29.7
  Top Layer w0.155: QT1_CH08.1@105.475,76.9 106.184,76.9 107.475,78.191 107.8,78.191 ; RTIN1_CH08.2@107.8,78.85 107.8,78.191 ; RTPD1_CH08.1@109.3,76.85 109.959,76.85 110.156,77.047 110.156,77.151 ; v1(112.517,77.151) 110.156,77.151 ; 107.8,78.191 109.154,78.191 110.156,77.189 110.156,77.151
  Bottom Layer w0.155: v1(112.517,77.151) 112.517,75.894 111.587,74.964 111.587,71.839 118.669,64.757 118.669,63.009 117.359,61.7 DTNEG1_CH08.1@116.675,61.7
TEMP_1WIRE: JTEMP1.2 RTEMP1.2 U1.J3_16 | length 65.2
  Top Layer w0.155: JTEMP1.2@52.25,72.68 51.2,71.63 RTEMP1.2@51.2,68.5 51.859,68.5 52.567,67.793 55.195,67.793 55.577,68.175 55.577,70.733 67.997,70.733 68.32,71.056 86.463,71.056 86.55,71.143 98.577,71.143 98.789,70.931 105.552,70.931 U1.J3_16@107.621,73
TPULL_CH01: DTPU1_CH01.1 RTPU1_CH01.1 | length 23.7
  Top Layer w0.155: v1(36.983,53.26) 37.215,53.029 v1(40.291,53.029) ; v1(42.124,44.6) RTPU1_CH01.1@43.2,44.6
  Bottom Layer w0.155: DTPU1_CH01.1@36.525,61.5 35.841,61.5 35.699,61.358 35.699,57.197 35.097,56.595 35.097,56.376 35.097,55.147 v1(36.983,53.26) ; v1(40.291,53.029) 40.291,46.433 v1(42.124,44.6)
TPULL_CH02: DTPU1_CH02.1 RTPU1_CH02.1 | length 22.6
  Top Layer w0.155: RTPU1_CH02.1@67.4,44.6 68.059,45.259 v1(71.436,45.259) ; v1(72.349,52.71) 74.592,52.71 v1(76.194,51.108) ; v1(72.581,45.782) v1(74.823,45.782)
  Bottom Layer w0.155: v1(71.436,45.259) 72.059,45.259 v1(72.581,45.782) ; DTPU1_CH02.1@71.475,56.5 71.475,55.791 72.349,54.917 v1(72.349,52.71) ; v1(74.823,45.782) 75.431,46.39 75.684,46.39 75.684,48.308 76.058,48.683 76.194,48.818 v1(76.194,51.108)
TPULL_CH03: DTPU1_CH03.1 RTPU1_CH03.1 | length 15.3
  Top Layer w0.155: v1(90.714,44.6) RTPU1_CH03.1@91.6,44.6
  Bottom Layer w0.155: v1(90.714,44.6) 90.918,44.6 93.651,47.333 93.651,48.15 96.093,50.592 96.093,55.373 95.675,55.791 DTPU1_CH03.1@95.675,56.5
TPULL_CH04: DTPU1_CH04.1 RTPU1_CH04.1 | length 15.9
  Top Layer w0.155: RTPU1_CH04.1@115.8,44.6 115.8,45.489 v1(116.068,45.757) ; v1(119.938,54.762) v1(119.938,57.447)
  Bottom Layer w0.155: v1(116.068,45.757) 116.667,46.356 116.667,48.03 118.865,50.228 119.535,50.228 119.938,50.63 v1(119.938,54.762) ; DTPU1_CH04.1@119.875,56.5 119.875,57.384 v1(119.938,57.447)
TPULL_CH05: DTPU1_CH05.1 RTPU1_CH05.1 | length 17.7
  Top Layer w0.155: RTPU1_CH05.1@44.6,76.05 v1(45.482,76.05) ; v1(44.91,65.501) 48.037,65.501 v1(49.214,64.324)
  Bottom Layer w0.155: v1(44.91,65.501) 44.91,75.477 v1(45.482,76.05) ; v1(49.214,64.324) 49.567,64.324 49.741,64.15 DTPU1_CH05.1@50.425,64.15
TPULL_CH06: DTPU1_CH06.1 RTPU1_CH06.1 | length 16.8
  Top Layer w0.155: RTPU1_CH06.1@68.8,76.05 69.459,76.05 69.771,75.738 v1(73.421,75.738)
  Bottom Layer w0.155: v1(73.421,75.738) 73.421,71.524 74.625,70.32 DTPU1_CH06.1@74.625,64.15
TPULL_CH07: DTPU1_CH07.1 RTPU1_CH07.1 | length 20.3
  Top Layer w0.155: RTPU1_CH07.1@93,76.05 v1(99.277,76.05)
  Bottom Layer w0.155: DTPU1_CH07.1@98.825,64.15 99.509,64.15 101.135,65.776 101.135,73.759 99.277,75.616 v1(99.277,76.05)
TPULL_CH08: DTPU1_CH08.1 RTPU1_CH08.1 | length 15.9
  Top Layer w0.155: RTPU1_CH08.1@117.2,76.05 119.418,76.05 v1(119.431,76.063)
  Bottom Layer w0.155: v1(119.431,76.063) 119.237,75.87 119.237,72.462 119.38,72.319 119.535,72.164 119.535,71.322 119.837,71.02 119.933,71.02 119.933,69.242 120.558,68.617 123.025,66.15 DTPU1_CH08.1@123.025,64.15
pads on no net: JPOWER1.MP1 JPOWER1.MP2

## Polygon pours and split planes (outlines as drawn)
GND on Top Layer "GND_TOP" (solid, remove dead copper, pour order 26): 27.4,25.7 123.6,25.7 ccw(c123.6,27.4) 125.3,27.4 125.3,93.25 ccw(c123.6,93.25) 123.6,94.95 27.4,94.95 ccw(c27.4,93.25) 25.7,93.25 25.7,27.4 ccw(c27.4,27.4)
GND on Bottom Layer "GND_BOTTOM" (solid, remove dead copper, pour order 27): 27.4,25.7 123.6,25.7 ccw(c123.6,27.4) 125.3,27.4 125.3,93.25 ccw(c123.6,93.25) 123.6,94.95 27.4,94.95 ccw(c27.4,93.25) 25.7,93.25 25.7,27.4 ccw(c27.4,27.4)

## Keep-outs
Keep-Out Layer:
  region: 60.306,70.5 60.306,50.1 68.766,50.1 68.766,70.5

## Other copper
Top Layer:
  pour cut-out: 60.306,50.1 68.766,50.1 68.766,70.5 60.306,70.5
Bottom Layer:
  pour cut-out: 60.306,50.1 68.766,50.1 68.766,70.5 60.306,70.5

## Silkscreen, mask and mechanical layers (free items; w line width, h text height)
Top Overlay:
  text "MB" at 119.3,76.25 h0.67
  text "DS18B20" at 49.4,75.5 h0.67
  text "CASE" at 120,44 h0.67